# Altium PCB Bracelet_Main.PcbDoc (part 2 of 3)
Units mil, origin at the board's own origin, x right, y up, seen from the top; angles counter-clockwise.
Board outline 865.94 x 2303.17 mil, 4 copper layers (Top Layer, POWER, GND, Bottom Layer), stack 7.834 mil thick; 115 components, 70 nets, 405 pads, 108 vias.
Unrouted connection lines stored in the file: 2.
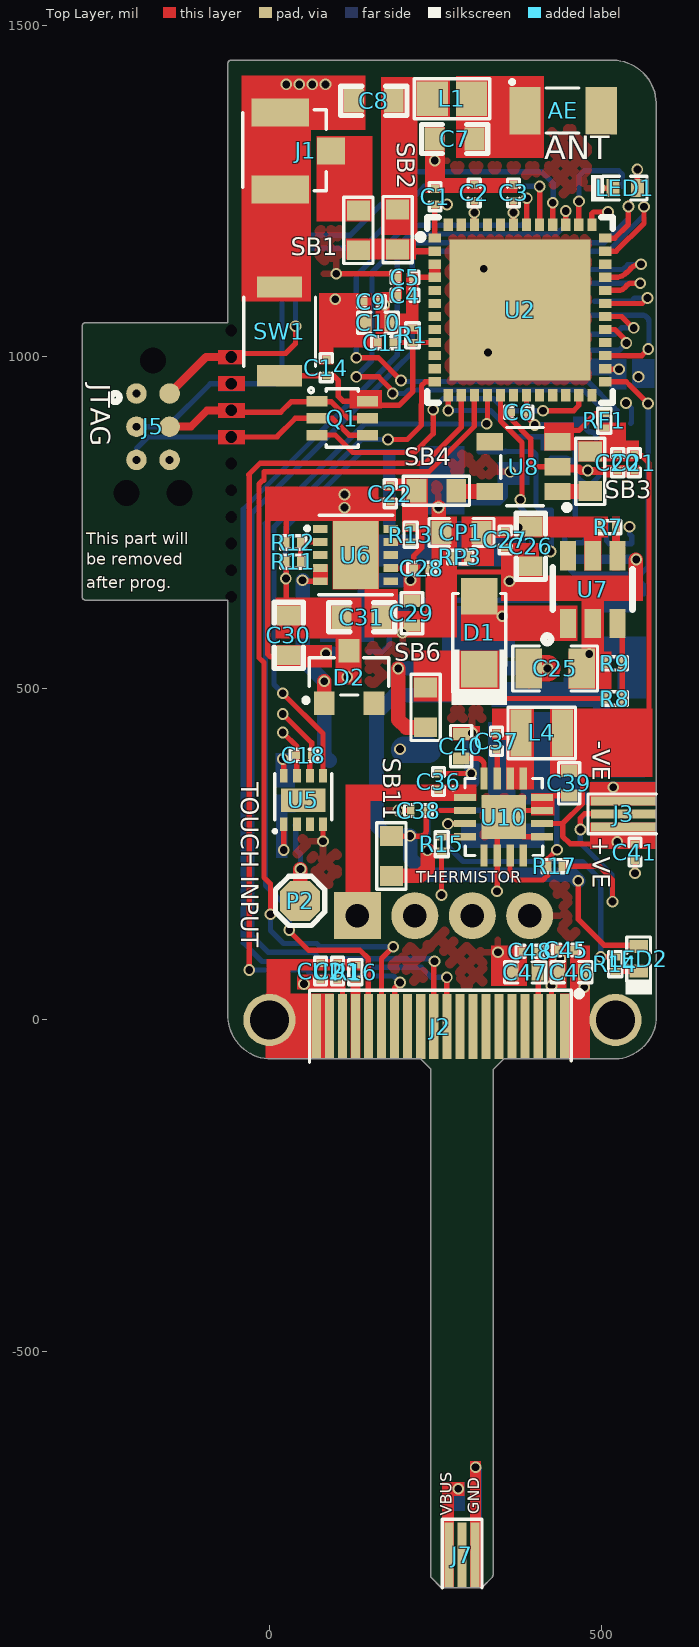
[diagram p0: Top Layer view]

## Part data (continued)
R9: library part 0201WMF7152TEE, "71.5kO ±1% 0.05W ±200ppm/? 0201 Chip Resistor - Surface Mount RoHS", Manufacturer="UNI-ROYAL(Uniroyal Elec)", Package=0201, Power(Watts)=Power(Watts), Resistance=71.5kO, Temperature Coefficient1=±200ppm/?, Tolerance=±1%
R11: library part WR02X9532FAL, "Res 95.3K Ohm 1% 1/20W 0201", Manufacturer="Walsin Technologies", Supplier Part Number 1=1292-WR02X9532FALTR-ND, Manufacturer Part Number=WR02X9532FAL, Pricing 1="15000=0.00247 (USD)", Supplier 1=Digi-Key
R12: library part 0201WMJ0133TEE, "13kO ±5% 1/20W ±200ppm/? 0201 Chip Resistor - Surface Mount RoHS", Manufacturer="UNI-ROYAL(Uniroyal Elec)", Operating Temperature Range=-, Package=0201, Power(Watts)=1/20W, Resistance=13kO, Temperature Coefficient=±200ppm/?, Tolerance=±5%
R13 R16: library part WR02X105JAL, "Res Thick Film 0201 1M Ohm 5% 0.05W(1/20W) ±200ppm/C Molded SMD Paper T/R", Case/Package=0201, Manufacturer="Walsin Technologies", Max Operating Temperature=125°C, Min Operating Temperature=-55°C, Resistance=1MR, Resistor Type="Thick Film", Supplier Part Number 1=1292-WR02X105JALCT-ND, Tolerance=5%, Category=Uncategorized, ComponentLink1Description=http://components.arrow.com/part/dataview/0323_00666329?src-supplier=Arrow+Europe, ComponentLink1URL=http://components.arrow.com/part/dataview/0323_00666329?src-supplier=Arrow+Europe, Depth=0.3mm, Length=0.6mm, Manufacturer Part Number=WR02X105JAL, Military Standard=Not, Packaging="Tape and Reel", Pricing 1="1=0.10000, 10=0.01800, 100=0.00750, 1000=0.00335, 2500=0.00291, 5000=0.00240 (USD)", RoHS=Yes, Stock 1=6920, Supplier 1=Digi-Key
R14: library part RC0201FR-071KL, "YAGEO - RC0201FR-071KL - RES, 1K, 1%, 0.05W, 0201, THICK FILM", Case Code (Imperial)=0201, Case Code (Metric)=0603, Manufacturer=Yageo, Max Operating Temperature=125°C, Max Power Dissipation=50mW, Min Operating Temperature=-55°C, Package Quantity=10000, Resistance=1kR, Resistance Tolerance=1%, Resistor Type="Thick Film", Supplier Part Number 1=311-1KMCT-ND, Temperature Coefficient=200ppm/°C, Voltage Rating=25V, Case/Package=0201, Category="Chip SMD Resistors", ComponentLink1Description=https://datasheet.ciiva.com/28419/pyu-rc0201-51-rohs-l-8-28419637.pdf?src-supplier=Avnet+Europe, ComponentLink1URL=https://datasheet.ciiva.com/28419/pyu-rc0201-51-rohs-l-8-28419637.pdf?src-supplier=Avnet+Europe, ComponentLink2Description=https://datasheet.ciiva.com/16855/pyu-rc0201-51-rohs-l-8-16855830.pdf?src-supplier=Avnet+Europe, ComponentLink2URL=https://datasheet.ciiva.com/16855/pyu-rc0201-51-rohs-l-8-16855830.pdf?src-supplier=Avnet+Europe, ComponentLink3Description=https://datasheet.ciiva.com/22698/1563626-22698505.pdf?src-supplier=Element14, ComponentLink3URL=https://datasheet.ciiva.com/22698/1563626-22698505.pdf?src-supplier=Element14, ComponentLink4Description=https://datasheet.ciiva.com/29721/pyu-r-int-thick-7-29721195.pdf?src-supplier=Digi-Key, ComponentLink4URL=https://datasheet.ciiva.com/29721/pyu-r-int-thick-7-29721195.pdf?src-supplier=Digi-Key, ComponentLink5Description=https://datasheet.ciiva.com/7672/1563626-7672204.pdf?src-supplier=Element14, ComponentLink5URL=https://datasheet.ciiva.com/7672/1563626-7672204.pdf?src-supplier=Element14, ComponentLink6Description=https://datasheet.ciiva.com/29721/pyu-r-int-thick-7-29721196.pdf?src-supplier=Digi-Key, ComponentLink6URL=https://datasheet.ciiva.com/29721/pyu-r-int-thick-7-29721196.pdf?src-supplier=Digi-Key, ComponentLink7Description=https://datasheet.ciiva.com/8896/pyu-rc0201-51-rohs-l-8-8896174.pdf?src-supplier=Avnet, ComponentLink7URL=https://datasheet.ciiva.com/8896/pyu-rc0201-51-rohs-l-8-8896174.pdf?src-supplier=Avnet, Construction=Rectangular, Contact Plating=Tin,Matte, Depth=0.3mm, Features="Moisture Resistant", Height=0.01inch, Lead Free="Lead Free", Length=0.024inch, Manufacturer Part Number=RC0201FR-071KL, Military Standard=Not, Number of Terminations=2, Packaging="Tape and Reel", Power Rating=50mW, Pricing 1="1=0.10000, 10=0.04200, 100=0.01700, 1000=0.00765, 2500=0.00664, 5000=0.00548 (USD)", Radiation Hardening=No, REACH SVHC=Unknown, RoHS=Yes, RoHS Compliant=Yes, Series=RC, Stock 1=1020398, Supplier 1=Digi-Key, Technology="THICK FILM", Termination=SMD/SMT, Tolerance=1%, Width=0.012inch, Working Voltage=25V
R15: library part 0201WMF1332TEE, "RES SMD 13.3K  1/20W 0201", Manufacturer="UNI-ROYAL(Uniroyal Elec)", Package=0201, Power=1/20W, Temperature Coefficient=±200ppm/?
R17: library part NCP03XH103F05RL, "NTC Thermistors 0201", Case Code (Imperial)=0201, Case Code (Metric)=0603, Manufacturer=Murata, Max Operating Temperature=125°C, Max Power Dissipation=100mW, Min Operating Temperature=-40°C, Package Quantity=1, Resistance=10kR, Tolerance=1%, Case/Package=0201, Category=Thermistors, ComponentLink1Description=http://components.arrow.com/part/dataview/51404656S675687N2606?src-supplier=Arrow+Electronics, ComponentLink1URL=http://components.arrow.com/part/dataview/51404656S675687N2606?src-supplier=Arrow+Electronics, ComponentLink2Description=http://www.mouser.com/ds/2/281/r44e-3685.pdf?src-supplier=Mouser, ComponentLink2URL=http://www.mouser.com/ds/2/281/r44e-3685.pdf?src-supplier=Mouser, ComponentLink3Description=http://components.arrow.com/part/dataview/0323_03440904?src-supplier=Arrow+Europe, ComponentLink3URL=http://components.arrow.com/part/dataview/0323_03440904?src-supplier=Arrow+Europe, ComponentLink4Description=http://www.murata.com/products/catalog/pdf/r44e.pdf?src-supplier=Avnet+Europe, ComponentLink4URL=http://www.murata.com/products/catalog/pdf/r44e.pdf?src-supplier=Avnet+Europe, ComponentLink5Description=http://www.murata.com/products/catalog/pdf/r44e.pdf?src-supplier=Digi-Key, ComponentLink5URL=http://www.murata.com/products/catalog/pdf/r44e.pdf?src-supplier=Digi-Key, ComponentLink6Description=https://www.murata.com/~/media/webrenewal/support/library/catalog/products/thermistor/r01e.ashx?src-supplier=Digi-Key, ComponentLink6URL=https://www.murata.com/~/media/webrenewal/support/library/catalog/products/thermistor/r01e.ashx?src-supplier=Digi-Key, ComponentLink7Description=http://www.murata.com/~/media/webrenewal/support/library/catalog/products/thermistor/ntc/r44e.ashx?src-supplier=Avnet, ComponentLink7URL=http://www.murata.com/~/media/webrenewal/support/library/catalog/products/thermistor/ntc/r44e.ashx?src-supplier=Avnet, Depth=0.3mm, Height=0.3mm, Lead Free="Lead Free", Length=0.6mm, Manufacturer Part Number=NCP03XH103F05RL, Mount="Surface Mount", Number of Pins=2, Packaging="Tape and Reel", Power Rating=100mW, Pricing 1="1=0.25690, 10=0.22690, 25=0.17210, 100=0.14240, 250=0.14110, 500=0.11960, 1000=0.10070, 3000=0.09970, 6000=0.08620, 15000=0.18060, 150000=0.17050, 1500000=0.11080, 7500000=0.07850 (USD)", Radiation Hardening=No, RoHS=Yes, RoHS Compliant=Yes, Stock 1=13718, Supplier 1="Arrow Electronics", Supplier Part Number 1=NCP03XH103F05RL, Termination=SMD/SMT, Width=0.3mm
R18: library part AC0201FR-0721KL, "Res SMD 21K Ohm 1% 1/20W 0201", Case/Package=0201, Manufacturer=Yageo, Max Operating Temperature=155°C, Max Power Dissipation=50mW, Min Operating Temperature=-55°C, Resistance=21kR, Resistor Type="Thick Film", Temperature Coefficient=200ppm/°C, Tolerance=1%, Category="Chip SMD Resistors", ComponentLink1Description=http://www.yageo.com/NewPortal/yageodocoutput?fileName=/pdf/R-Chip/PYu-AC_51_RoHS_L_6.pdf&src-supplier=Digi-Key, ComponentLink1URL=http://www.yageo.com/NewPortal/yageodocoutput?fileName=/pdf/R-Chip/PYu-AC_51_RoHS_L_6.pdf&src-supplier=Digi-Key, Features="Moisture Resistant,Automotive AEC-Q200", Height=0.01inch, Length=0.024inch, Manufacturer Part Number=AC0201FR-0721KL, Number of Terminations=2, Packaging="Tape and Reel", Pricing 1="10000=0.00168, 20000=0.00165, 40000=0.00161, 60000=0.00157, 80000=0.00151, 100000=0.00148, 1000000=0.00144 (USD)", RoHS=Yes, RoHS Compliant=Yes, Supplier 1=Avnet, Supplier Part Number 1=AC0201FR-0721KL, Width=0.012inch
R19: library part RK73H1HTTC4321F, "Thick Film Resistors - SMD 4.32K OHM 1%", Case Code (Imperial)=0201, Case Code (Metric)=0603, Manufacturer="KOA Speer", Max Operating Temperature=125°C, Min Operating Temperature=-55°C, Package Quantity=10000, Power Rating=50mW, Resistance=4.32kR, Resistor Type="Thick Film", Supplier Part Number 1=2019-RK73H1HTTC4321FCT-ND, Temperature Coefficient=200ppm/°C, Tolerance=1%, Voltage Rating=25V, Case/Package=0201, Category="Chip SMD Resistors", ComponentLink1Description=https://datasheet.ciiva.com/5556/rk73h-5715-5556569.pdf?src-supplier=Mouser, ComponentLink1URL=https://datasheet.ciiva.com/5556/rk73h-5715-5556569.pdf?src-supplier=Mouser, Height=0.23mm, Lead Free="Lead Free", Length=0.6mm, Manufacturer Part Number=RK73H1HTTC4321F, Packaging="Tape and Reel", Pricing 1="1000=0.01370 (USD)", RoHS=Yes, RoHS Compliant=Yes, Series=RK73H, Supplier 1=Digi-Key, Termination=SMD/SMT, Voltage Rating (DC)=25V, Width=0.3mm
RP1 RP2 RP3: library part RC0201FR-0710KL, "GENERAL 0201 11% REEL (7INCH)", Case Code (Imperial)=0201, Case Code (Metric)=0603, Manufacturer=Yageo, Max Operating Temperature=125°C, Max Power Dissipation=50mW, Min Operating Temperature=-55°C, Package Quantity=1, Resistance=10kR, Resistor Type="Thick Film", Supplier Part Number 1=311-10.0KMCT-ND, Temperature Coefficient=200ppm/°C, Tolerance=1%, Voltage Rating=25V, Case/Package=0201, Category="Chip SMD Resistors", ComponentLink1Description=https://datasheet.ciiva.com/2467/pyu-r-int-thick-7-2467109.pdf?src-supplier=Digi-Key, ComponentLink1URL=https://datasheet.ciiva.com/2467/pyu-r-int-thick-7-2467109.pdf?src-supplier=Digi-Key, ComponentLink2Description=https://datasheet.ciiva.com/2467/pyu-r-int-thick-7-2467110.pdf?src-supplier=Digi-Key, ComponentLink2URL=https://datasheet.ciiva.com/2467/pyu-r-int-thick-7-2467110.pdf?src-supplier=Digi-Key, ComponentLink3Description=https://datasheet.ciiva.com/2467/pyu-r-int-thick-7-2467111.pdf?src-supplier=Digi-Key, ComponentLink3URL=https://datasheet.ciiva.com/2467/pyu-r-int-thick-7-2467111.pdf?src-supplier=Digi-Key, ComponentLink4Description=https://datasheet.ciiva.com/7660/1421516-7660807.pdf?src-supplier=Element14, ComponentLink4URL=https://datasheet.ciiva.com/7660/1421516-7660807.pdf?src-supplier=Element14, ComponentLink5Description=https://datasheet.ciiva.com/8891/pyu-rc0201-51-rohs-l-8-8891384.pdf?src-supplier=Avnet, ComponentLink5URL=https://datasheet.ciiva.com/8891/pyu-rc0201-51-rohs-l-8-8891384.pdf?src-supplier=Avnet, ComponentLink6Description=https://datasheet.ciiva.com/28405/pyu-rc0201-51-rohs-l-8-28405609.pdf?src-supplier=Avnet+Europe, ComponentLink6URL=https://datasheet.ciiva.com/28405/pyu-rc0201-51-rohs-l-8-28405609.pdf?src-supplier=Avnet+Europe, ComponentLink7Description=https://datasheet.ciiva.com/26829/getdatasheetpartid-421074-26829851.pdf?src-supplier=Verical, ComponentLink7URL=https://datasheet.ciiva.com/26829/getdatasheetpartid-421074-26829851.pdf?src-supplier=Verical, ComponentLink8Description=https://datasheet.ciiva.com/46391/1421516-46391339.pdf?src-supplier=Element14, ComponentLink8URL=https://datasheet.ciiva.com/46391/1421516-46391339.pdf?src-supplier=Element14, ComponentLink9Description=https://datasheet.ciiva.com/16855/pyu-rc0201-51-rohs-l-8-16855789.pdf?src-supplier=Avnet+Europe, ComponentLink9URL=https://datasheet.ciiva.com/16855/pyu-rc0201-51-rohs-l-8-16855789.pdf?src-supplier=Avnet+Europe, Contact Plating=Tin,Matte, Depth=0.3mm, Features="Moisture Resistant", Height=0.01inch, Lead Free="Lead Free", Length=0.6mm, Manufacturer Part Number=RC0201FR-0710KL, Military Standard=Not, Number of Pins=2, Number of Terminations=2, Packaging="Tape and Reel", Power Rating=50mW, Pricing 1="1=0.10000, 10=0.03600, 100=0.01480, 1000=0.00665, 2500=0.00577, 5000=0.00477 (USD)", Radiation Hardening=No, REACH SVHC="No SVHC", RoHS=Yes, Stock 1=6892350, Supplier 1=Digi-Key, Termination=SMD/SMT, Voltage Rating (DC)=25V, Weight=6E-06oz, Width=0.3mm, Working Voltage=25V
SB1 SB2 SB3 SB4 SB6 SB7 SB8 SB9 SB10 SB11 SB12 SB13 SB14: "Solder Bridge ON"
SW1: "SWITCH TACTILE SPST-NO 0.05A 12V", Contact Current Rating=50mA, Contact Resistance=100mR, Insulation Resistance=100MR, Manufacturer=Omron, Max Operating Temperature=70°C, Max Voltage Rating (DC)=12V, Min Operating Temperature=-25°C, Operating Force=1.5N, Package Quantity=1, Ratings="Dust Proof,IP40", Supplier Part Number 1=SW1020DKR-ND, Actuator Length=0.4mm, Actuator Type=Standard, ComponentLink1Description=http://www.farnell.com/datasheets/60838.pdf?src-supplier=Farnell, ComponentLink1URL=http://www.farnell.com/datasheets/60838.pdf?src-supplier=Farnell, ComponentLink2Description=http://www.farnell.com/datasheets/60838.pdf?src-supplier=Element14, ComponentLink2URL=http://www.farnell.com/datasheets/60838.pdf?src-supplier=Element14, ComponentLink3Description=https://omronfs.omron.com/en_US/ecb/products/pdf/en-b3u.pdf?src-supplier=Digi-Key, ComponentLink3URL=https://omronfs.omron.com/en_US/ecb/products/pdf/en-b3u.pdf?src-supplier=Digi-Key, ComponentLink4Description=http://www.omron.com/ecb/products/pdf/en-b3u.pdf?src-supplier=Digi-Key, ComponentLink4URL=http://www.omron.com/ecb/products/pdf/en-b3u.pdf?src-supplier=Digi-Key, ComponentLink5Description=https://www.distrelec.biz/Web/Downloads/he/et/B3U_eng_datasheet.pdf?mime=application%2Fpdf&src-supplier=Distrelec, ComponentLink5URL=https://www.distrelec.biz/Web/Downloads/he/et/B3U_eng_datasheet.pdf?mime=application%2Fpdf&src-supplier=Distrelec, ComponentLink6Description=http://www.onlinecomponents.com/productFiles/mf-OM/en-b3u.pdf?src-supplier=Onlinecomponents.com, ComponentLink6URL=http://www.onlinecomponents.com/productFiles/mf-OM/en-b3u.pdf?src-supplier=Onlinecomponents.com, ComponentLink7Description=https://www.verical.com/server-webapp/html/getDatasheet?partID=552554&src-supplier=Verical, ComponentLink7URL=https://www.verical.com/server-webapp/html/getDatasheet?partID=552554&src-supplier=Verical, ComponentLink8Description=http://www.farnell.com/datasheets/1685550.pdf?src-supplier=Element14, ComponentLink8URL=http://www.farnell.com/datasheets/1685550.pdf?src-supplier=Element14, ComponentLink9Description=http://www.farnell.com/datasheets/2610940.pdf?src-supplier=Farnell, ComponentLink9URL=http://www.farnell.com/datasheets/2610940.pdf?src-supplier=Farnell, ComponentLink10Description=https://www.alliedelec.com/m/d/4c8a9ef82804fc3c241a13c1e298fd73.pdf?src-supplier=Allied+Electronics, ComponentLink10URL=https://www.alliedelec.com/m/d/4c8a9ef82804fc3c241a13c1e298fd73.pdf?src-supplier=Allied+Electronics, Contact Material=Silver, Current Rating=50mA, Depth=2.5mm, Electrical Life=200000Cycles, Height=1.2mm, Illumination Type=Non-Illuminated,Illuminated, Lead Free="Lead Free", Length=4mm, Manufacturer Part Number=B3U-1000P, Max Current Rating=50mA, Mechanical Life=200000Cycles, Mount="Surface Mount", Orientation=Straight, Packaging="Tape and Reel", Pricing 1="1=1, 10=0.961, 25=0.9064, 50=0.7976, 100=0.7251, 250=0.68888, 500=0.67074, 1000=0.52571 (USD)", REACH SVHC=Unknown, Stock 1=116454, Supplier 1=Digi-Key, Switch Function=Off-Mom, Switch Travel=0.15mm, Termination=SMD/SMT, Throw Configuration=SPST, Voltage Rating (DC)=12V, Weight=0.000776oz, Width=3mm
U2: "RX TXRX MOD WIFI SURFACE MOUNT", Case/Package=SMD/SMT, Frequency=2.5GHz, Manufacturer="Espressif Systems", Max Operating Temperature=85°C, Min Operating Temperature=-40°C, Supplier Part Number 1=1904-1029-1-ND, ComponentLink1Description=https://www.espressif.com/sites/default/files/documentation/esp32-pico-d4_datasheet_en.pdf?src-supplier=Digi-Key, ComponentLink1URL=https://www.espressif.com/sites/default/files/documentation/esp32-pico-d4_datasheet_en.pdf?src-supplier=Digi-Key, Data Rate=150Mbps, Interface=I2C,SPI,GPIO,PWM,SDIO,UART, Manufacturer Part Number=ESP32-PICO-D4, Memory Size=4MB, Mount="Surface Mount", Pricing 1="1=4.5 (USD)", Sensitivity=-98.4dBm, Stock 1=5967, Supplier 1=Digi-Key
U3: "Volatile 64Mb (8M x 8) SPI/ QPI 2.7V ~ 3.6V SOP-8_150mil RAM RoHS", Manufacturer="Lyontek Inc.", Package=SOP-8, Manufacturer Part No=LY68L6400SLIT
U4: "WIDE-FULL SCALE RANGE 6-AXIS MEM", Case/Package=QFN, Manufacturer="TDK InvenSense", Max Operating Temperature=85°C, Min Operating Temperature=-40°C, Supplier Part Number 1=1428-1142-1-ND, Category="Inertial Measurement Units (IMUs)", Manufacturer Part Number=ICM-20649, Mount="Surface Mount", Output Type=SPI,I2C, Packaging="Tape and Reel", Pricing 1="1=12.32000, 5=8.00000, 10=7.20000, 25=6.40000, 50=5.92000, 100=5.12000, 500=4.80000, 1000=4.48000 (USD)", RoHS=Yes, RoHS Compliant=Yes, Sensor Type="Accelerometer,Gyroscope,6 Axis,Temperature", Stock 1=4990, Supplier 1=Digi-Key
U5: "IC SENSR TOUCH/PROX 1CH 8-UDFN", Manufacturer=Microchip, Supplier Part Number 1=AT42QT1011-MAHRCT-ND, Category="Integrated Circuits (ICs)", ComponentLink1Description=http://www.microchip.com/mymicrochip/filehandler.aspx?ddocname=en590560&src-supplier=Digi-Key, ComponentLink1URL=http://www.microchip.com/mymicrochip/filehandler.aspx?ddocname=en590560&src-supplier=Digi-Key, Manufacturer Part Number=AT42QT1011-MAHR, Pricing 1="1=0.61000, 25=0.56000, 100=0.50700 (USD)", RoHS=No, Stock 1=3160, Supplier 1=Digi-Key
U6: "33V 4A DFN-10 DC-DC Converters RoHS", Current - Output=4A, Frequency - Switching=1MHz, Manufacturer="Silergy Corp", Package=DFN-10, Voltage - Input (Max)=33V, Voltage - Input (Min)=3V, Voltage - Output (Min/Fixed)=0.6V, Function=Step-Up, Number of Outputs=1, Output Configuration=Positive, Output Type=Adjustable, Topology=Boost, Voltage - Output (Max)=33V
U7: "Step-Up Positive Adjustable 1 2A 1.2MHz SOT-23-6 DC-DC Converters RoHS", Manufacturer="Axelite Tech", Package=SOT-23-6, Manufacturer Part No=AX5523CA
U8: "IC PWR SWITCH P-CHAN 1:1 SOT23-5", Manufacturer=Microchip, Supplier Part Number 1=576-2582-1-ND, Category="Hot Swap Controllers", ComponentLink1Description=http://components.arrow.com/part/dataview/42608079S9274031N1374?src-supplier=Arrow+Electronics, ComponentLink1URL=http://components.arrow.com/part/dataview/42608079S9274031N1374?src-supplier=Arrow+Electronics, ComponentLink2Description=http://uk.rs-online.com/webdocs/0f82/0900766b80f822a9.pdf?src-supplier=RSComponents, ComponentLink2URL=http://uk.rs-online.com/webdocs/0f82/0900766b80f822a9.pdf?src-supplier=RSComponents, ComponentLink3Description=http://components.arrow.com/part/dataview/0323_00165048?src-supplier=Arrow+Europe, ComponentLink3URL=http://components.arrow.com/part/dataview/0323_00165048?src-supplier=Arrow+Europe, ComponentLink4Description=http://www.mouser.com/ds/2/268/mic20xx-778478.pdf?src-supplier=Mouser, ComponentLink4URL=http://www.mouser.com/ds/2/268/mic20xx-778478.pdf?src-supplier=Mouser, ComponentLink5Description=http://www.farnell.com/datasheets/1670778.pdf?src-supplier=Element14, ComponentLink5URL=http://www.farnell.com/datasheets/1670778.pdf?src-supplier=Element14, ComponentLink6Description=http://www.microchip.com/mymicrochip/filehandler.aspx?ddocname=en579487&src-supplier=Digi-Key, ComponentLink6URL=http://www.microchip.com/mymicrochip/filehandler.aspx?ddocname=en579487&src-supplier=Digi-Key, ComponentLink7Description=http://www.micrel.com/_PDF/mic20xx.pdf?src-supplier=Future+Electronics, ComponentLink7URL=http://www.micrel.com/_PDF/mic20xx.pdf?src-supplier=Future+Electronics, Manufacturer Part Number=MIC2004-0.5YM5-TR, Pricing 1="1=0.79000, 25=0.65000, 100=0.59000 (USD)", RoHS=Yes, Stock 1=5462, Supplier 1=Digi-Key
U9: "IC REG LINEAR 3.3V 1A UDFN3030-8", Dropout Voltage=360mV, Manufacturer=Diodes, Max Operating Temperature=85°C, Min Current Limit=1.1A, Min Operating Temperature=-40°C, Output Current=1A, Output Voltage=3.3V, Supplier Part Number 1=AP7361C-33FGE-7DICT-ND, Category="Voltage Regulators - Linear", ComponentLink1Description=http://www.mouser.com/ds/2/115/AP7361C-775034.pdf?src-supplier=Mouser, ComponentLink1URL=http://www.mouser.com/ds/2/115/AP7361C-775034.pdf?src-supplier=Mouser, ComponentLink2Description=https://www.diodes.com/assets/Datasheets/AP7361C.pdf?src-supplier=Digi-Key, ComponentLink2URL=https://www.diodes.com/assets/Datasheets/AP7361C.pdf?src-supplier=Digi-Key, Manufacturer Part Number=AP7361C-33FGE-7, Mount="Surface Mount", Number of Regulators=1, Packaging="Tape and Reel", Pricing 1="1=0.56000, 10=0.48100, 25=0.44880, 100=0.35910, 250=0.33348, 500=0.28218, 1000=0.21804 (USD)", RoHS=Yes, RoHS Compliant=Yes, Stock 1=84, Supplier 1=Digi-Key
U10: "STANDALONE 1-CELL 17-V, 3.0-A BA", Manufacturer="Texas Instruments", Supplier Part Number 1=296-BQ25303JRTERCT-ND, Manufacturer Part Number=BQ25303JRTER, Pricing 1="1=2.19000, 10=1.96600, 25=1.85520, 100=1.58050, 250=1.48400, 500=1.29850, 1000=1.16900 (USD)", RoHS=Yes, Stock 1=2495, Supplier 1=Digi-Key

## Free pads (board coordinates)
  round 78.74 hole 59.06: MH1(521.85,0) MH2(0,0)
  round 0 hole 17.72 unplated mask+0: NC(-57.51,638.03) NC(-57.51,678.19) NC(-57.51,718.35) NC(-57.51,758.5) NC(-57.51,838.82) NC(-57.51,1039.61)
  round 0 hole 17.72 mask+0: NC(-57.51,798.66) NC(-57.51,878.98) NC(-57.51,919.13) NC(-57.51,959.29) NC(-57.51,999.45)

## Via types
v1: diameter 17.72, hole 11.81, Top Layer to Bottom Layer, tented both sides, 100 vias
v2: diameter 17.72, hole 11.81, Top Layer to Bottom Layer, tented top, 4 vias
v3: diameter 17.72, hole 11.81, Top Layer to Bottom Layer, 4 vias

## Nets (pads, with @x,y where several pads share a name; then routed paths per layer and width w, separated by ;. In a path a pad name is that pad's centre, name@x,y a point inside that pad or via, vN(x,y) a via of type N, cw(c..) or ccw(c..) an arc to the next point about the centre after c; other vN are vias at no path point)
3V3: C1.1 C2.1 C3.1 C4.1 C5.1 C6.1 C9.1 C10.1 C15.1 C16.1 C18.1 C34.1 C35.1 CU1.1 CU2.1 J2.18 J5.1 pad.NC@-57.51,838.82 R1.2 R4.2 R5.2 U2.1 U2.3 U2.4 U2.19 U2.37 U2.43 U2.46 U4.8 U4.13 U4.22 U5.7 U9.1 | length 921.6
  Top Layer w8: v1(20.08,433.46) 41.34,412.2 U5.7@41.34,368.11 ; v1@50,53.54 50.47,54.02 v1(52.05,54.02) ; CU1.1@102.76,60.63 110.04,53.34 J2.18@110.04,-10.02 ; C5.1@214.76,1118.26 cw(c216.28,1118.26) C5.1@216.28,1119.77 U2.4@249.36,1119.77 U2.4@249.76,1119.77 ; U2.1@249.36,1178.83 C1.1@249.36,1228.26 ; C1.1@249.76,1229.45 v1(267.83,1229.45) ; U2.46@309.01,1199.1 v1(309.01,1217.26) C2.1@309.01,1235.26 ; U2.43@368.06,1199.1 368.06,1216.26 367.76,1216.56 367.76,1234.96 C3.1@368.06,1235.26 ; C6.1@388.58,915.35 C6.1@387.75,916.19 ; U2.19@388.58,941.18 U2.19@387.75,942.02 C6.1@387.75,916.19 ; v1(400,897.24) 387.75,909.5 C6.1@387.75,916.19 ; U2.37@486.17,1199.1 486.17,1215.67 488.76,1218.26 v1(510.43,1218.26)
  Bottom Layer w8: U9.1@316.24,856.64 355.49,856.64 C34.1@356.1,857.25 356.27,857.09 C35.1@388.19,857.09 397.51,857.09 401.9,852.69 401.9,774.47 408.08,768.3 U4.13@424.81,768.3 424.81,707.22 v1(423.94,706.35) ; v1(400,897.24) 474.17,897.24 R4.2@477.43,900.5 477.43,893.53 ccw(c484.25,893.53) 484.25,886.7 cw(c484.25,878.45) 492.51,878.45 U4.22@492.51,867.5 ; U4.8@508.25,748.2 U4.8@508.25,747.84 508.25,722.45 512.6,718.11 C16.1@520.87,718.11 C15.1@545.67,718.11 546.46,718.9 546.46,729.13 542.91,732.68 v1(542.91,743.7) ; v1(537.8,930.31) 545.91,922.2 R5.2@545.91,900.5 R5.2@544.62,899.21
  other v1: 172.83,1078.35 368.06,1217.26
  other v3: -200.51,944.5
3V3AD: C26.1 C27.1 CP1.2 DP1.3 L2.1 R7.2 RP3.2 U7.5
  other v1: 375.98,742.52
12V: C25.1 C45.1 C46.1 J2.2 SB6.2 | length 452.3
  Top Layer w8: C25.1@382.25,511.4 cw(c382.25,500.4) 391.66,506.1 cw(c364.55,500.4) 392,504.11 ccw(c387.13,500.4) C25.1@387.13,506.52 ; J2.2@424.26,-9.28 J2.2@425,-10.02 425.2,-9.83 v1(425.2,51.57)
  Top Layer w22: v1(194.35,530.06) 194.35,452.93 206.3,440.98 SB6.2@235.43,440.98
  Top Layer w40: C25.1@396.54,529.92 396.68,530.06 v1(419.14,530.06)
  Bottom Layer w22: v1(194.35,530.06) v1(419.14,530.06)
  other v1: 438.58,92.52
#EN_AD: R7.1 U7.4
#FB_: R11.2 R12.2 U6.2 | length 59.1
  Top Layer w8: R11.2@46.96,690.91 46.96,718.91 cw(c47.96,718.91) 47.96,719.91 47.96,720.59 U6.2@76.82,720.59
CMD: U2.30 U3.7 | length 129.5
  Top Layer w8: U2.30@506.45,1060.72 531.1,1060.72 548.25,1043.56 v1(549.25,1043.56)
  Bottom Layer w8: U3.7@486.25,1033.56 486.36,1033.67 521.17,1033.67 531.06,1043.56 v1(549.25,1043.56) 550.25,1043.56 v1@551.25,1042.56 ; v1@549.25,1046.56 cw(c549.25,1043.56) 552.25,1043.56 v1@551.25,1042.56 ; v1@550.47,1043.35 v1@551.25,1042.56 ; v1@553.25,1040.56 v1@551.25,1042.56
CS#: J2.16 U2.16 | length 1305.4
  Top Layer w8: v1(29.92,135.43) 29.92,134.25 59.06,105.12 136.61,105.12 149.21,92.52 J2.16@149.21,15.75 ; J2.16@149.41,-24.18 J2.16@149.41,-10.02 J2.16@150.14,-9.3 ; J2.16@152.3,-18.02 J2.16@152.3,-10.02 ; v1@328.69,898.82 U2.16@328.69,942.02
  Bottom Layer w8: v1(29.92,135.43) 29.92,166.93 -6.06,202.91 -6.06,748.34 -6.3,748.58 143.55,898.43 327.56,898.43 v1(327.56,898.82)
D/C#: J2.14 U2.14 | length 1450.3
  Top Layer w8: v1(-30.31,75.2) -30.31,821.41 -31.1,822.2 -13.92,839.38 234.88,839.38 289.32,893.82 U2.14@289.32,942.02 ; J2.14@188.78,-10.02 188.78,48.23 v1(196.85,56.3)
  Bottom Layer w8: v1(-30.31,75.2) 56.12,75.2 59.44,71.87 65.03,66.29 186.86,66.29 v1(196.85,56.3)
DTR: J5.5 pad.NC@-57.51,878.98 Q1.2 Q1.4 | length 393.8
  Top Layer w8: pad.NC@-57.51,878.98 11.22,878.98 11.67,879.42 11.67,879.84 38.92,907.09 94.88,907.09 120.47,881.5 Q1.4@146.59,881.5
  Bottom Layer w8: v1(-200.51,844.5) -200.51,861.5 -183.04,878.98 pad.NC@-57.51,878.98
EN_#: R13.2 U6.9 | length 33
  Top Layer w8: U6.9@183.11,720.91 215.79,720.91 R13.2@215.79,720.59
EN_AD: RP2.2 U2.17 | length 479
  Top Layer w8: U2.17@347.89,941.53 U2.17@348.38,942.02 348.38,903.2 380.85,870.72 380.85,786.76 v1(378.35,784.25)
  Bottom Layer w8: v1(378.35,784.25) 378.35,772.96 395.61,755.7 395.61,675.28 411.89,659 560.68,659 564.57,655.12 RP2.2@564.57,642.52
ENABLE: C11.1 C14.1 Q1.6 R1.1 SW1.1 U2.9 | length 380
  Top Layer w8: SW1.1@15.35,971.26 85.43,971.26 C14.1@85.83,971.65 96.46,971.65 103.94,964.17 103.94,940.04 110.9,933.07 Q1.6@148.03,933.07 154.47,926.63 195.53,926.63 216.28,947.39 216.28,1020.83 R1.1@215.76,1021.35 ; C11.1@186.76,1021.26 186.76,1021.35 R1.1@215.76,1021.35 ; U2.9@249.36,1020.73 U2.9@249.36,1021.35 R1.1@215.76,1021.35
FB_: R8.2 R9.2 U7.3 | length 112.5
  Top Layer w8: R8.2@531.79,484.65 U7.3@531.79,597.13